# Altium PCB EMG_Arm_ELCT-V3.0.PcbDoc (part 2 of 3)
Units mil, origin at the board's own origin, x right, y up, seen from the top; angles counter-clockwise.
Board outline 8303.83 x 7532.25 mil, 2 copper layers (Top Layer, Bottom Layer), stack 3.556 mil thick; 104 components, 76 nets, 393 pads, 162 vias.
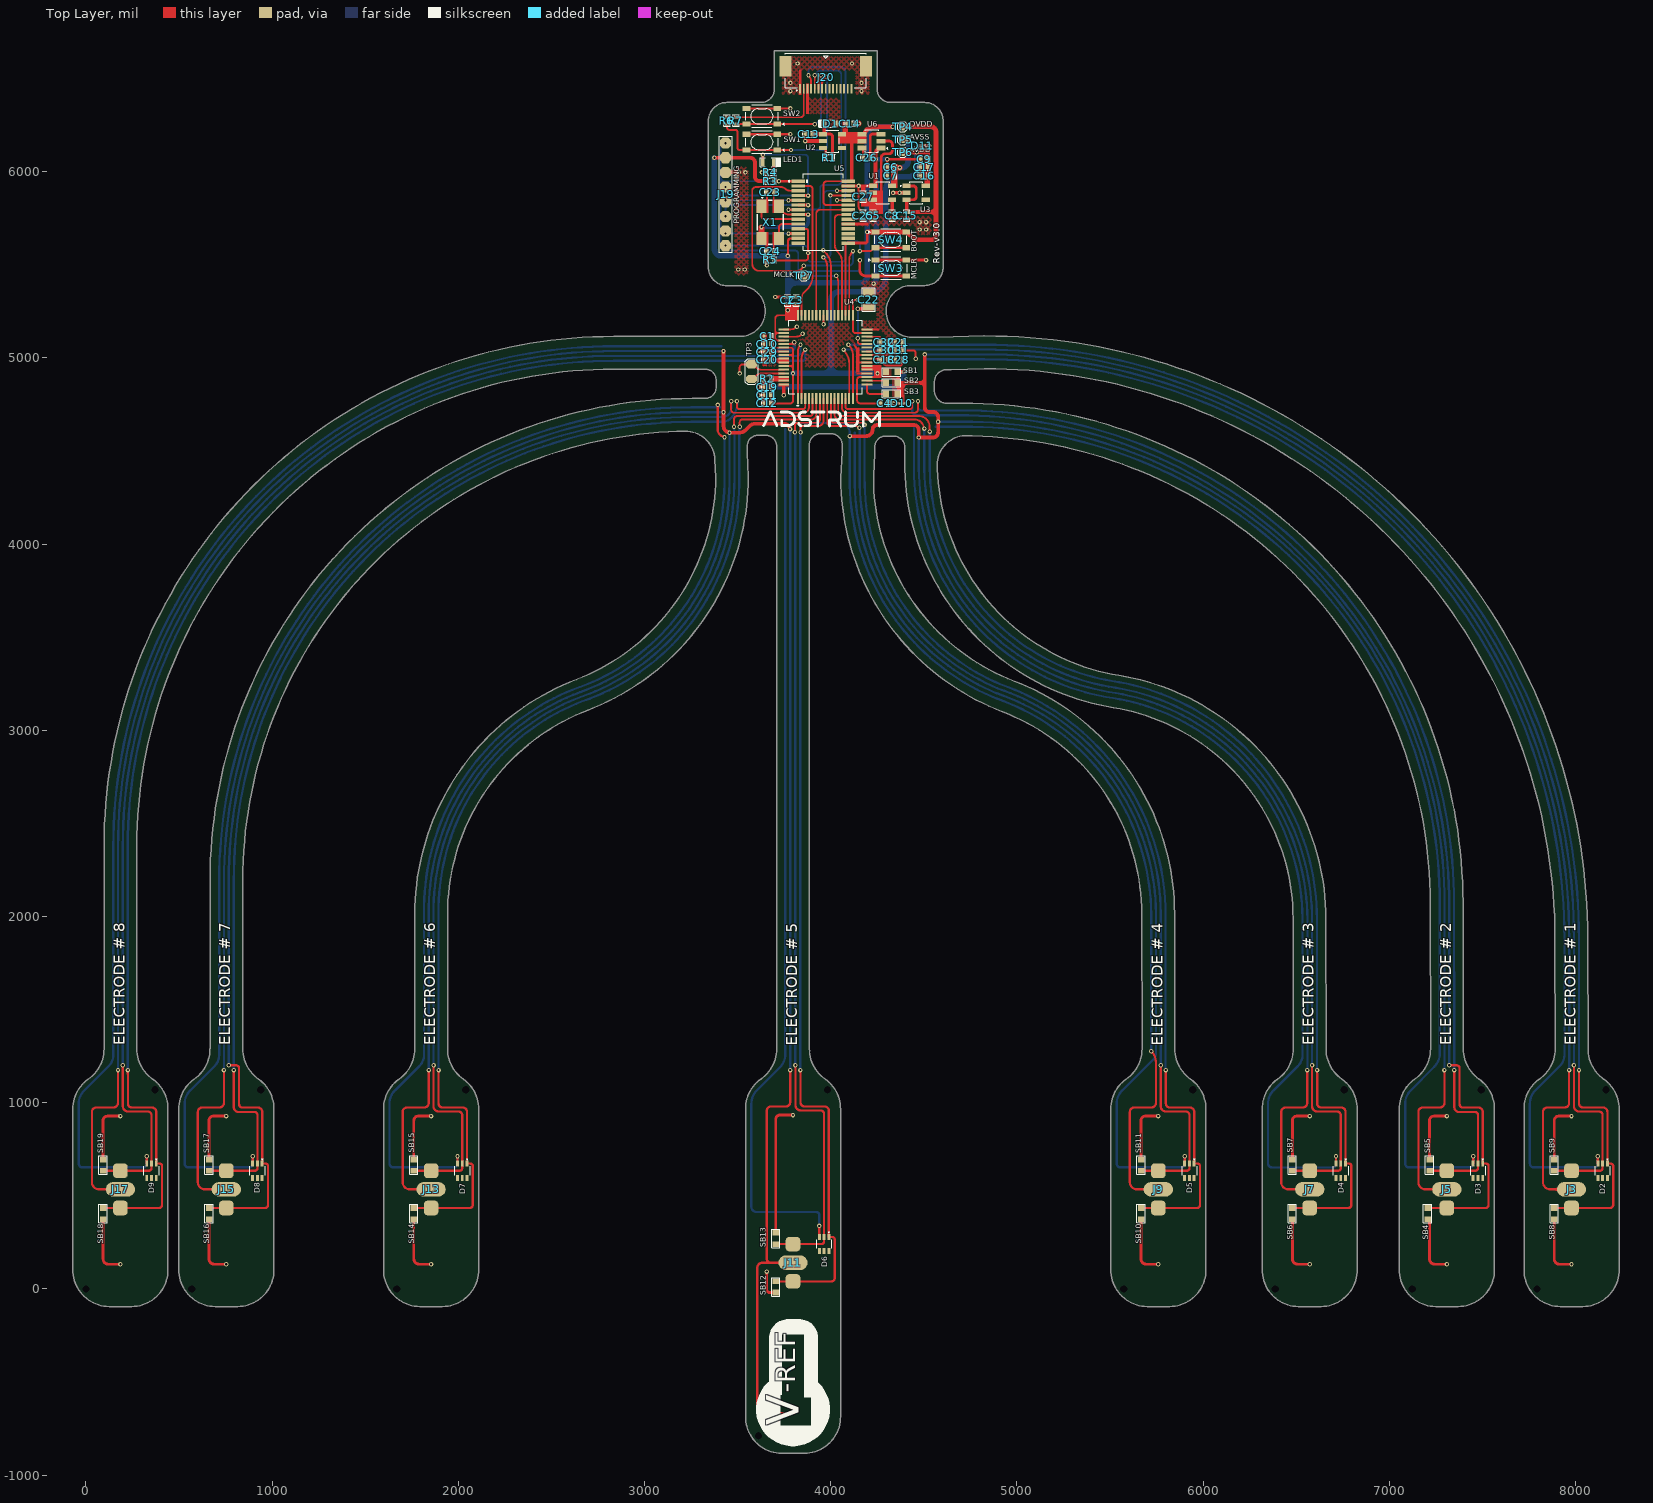
[diagram p0: Top Layer view]

## Part data (continued)
U1: "IC REG LIN -2.5V 200MA SOT23-5", Case/Package=SOT-23, Dropout Voltage=280mV, Input Bias Current=130uA, LCSC Part Number=C69932, Manufacturer="Texas Instruments", Max Operating Temperature=125°C, Max Output current=200mA, Max Output Voltage=-2.5V, Max Power Dissipation=560mW, Max Supply Voltage=-2.7V, Min Current Limit=300mA, Min Input Voltage=-10V, Min Operating Temperature=-40°C, Package Quantity=3000, Accuracy=2%, ComponentLink1Description=http://www.mouser.com/ds/2/405/slvs346c-521947.pdf?src-supplier=Mouser, ComponentLink1URL=http://www.mouser.com/ds/2/405/slvs346c-521947.pdf?src-supplier=Mouser, ComponentLink2Description=http://components.arrow.com/part/dataview/40177093S9611537N7713?src-supplier=Arrow+Electronics, ComponentLink2URL=http://components.arrow.com/part/dataview/40177093S9611537N7713?src-supplier=Arrow+Electronics, ComponentLink3Description=http://www.ti.com/general/docs/lit/getliterature.tsp?genericPartNumber=TPS723&amp;&amp;fileType=pdf&src-supplier=Farnell, ComponentLink3URL=http://www.ti.com/general/docs/lit/getliterature.tsp?genericPartNumber=TPS723&amp;&amp;fileType=pdf&src-supplier=Farnell, ComponentLink4Description=http://www.ti.com/general/docs/lit/getliterature.tsp?genericPartNumber=TPS723&amp;&amp;fileType=pdf&src-supplier=Element14, ComponentLink4URL=http://www.ti.com/general/docs/lit/getliterature.tsp?genericPartNumber=TPS723&amp;&amp;fileType=pdf&src-supplier=Element14, ComponentLink5Description=http://www.ti.com/lit/ds/symlink/tps723.pdf?src-supplier=Digikey, ComponentLink5URL=http://www.ti.com/lit/ds/symlink/tps723.pdf?src-supplier=Digikey, ComponentLink6Description=http://www.ti.com/general/docs/suppproductinfo.tsp?distId=10&amp;gotoUrl=http%3A%2F%2Fwww.ti.com%2Flit%2Fgpn%2Ftps723&src-supplier=Digikey, ComponentLink6URL=http://www.ti.com/general/docs/suppproductinfo.tsp?distId=10&amp;gotoUrl=http%3A%2F%2Fwww.ti.com%2Flit%2Fgpn%2Ftps723&src-supplier=Digikey, ComponentLink7Description=http://www.ti.com/general/docs/lit/getliterature.tsp?genericPartNumber=TPS723&amp;&amp;fileType=pdf&src-supplier=Newark, ComponentLink7URL=http://www.ti.com/general/docs/lit/getliterature.tsp?genericPartNumber=TPS723&amp;&amp;fileType=pdf&src-supplier=Newark, ComponentLink8Description=http://www.ti.com/general/docs/lit/getliterature.tsp?genericPartNumber=TPS723&&fileType=pdf&src-supplier=Avnet, ComponentLink8URL=http://www.ti.com/general/docs/lit/getliterature.tsp?genericPartNumber=TPS723&&fileType=pdf&src-supplier=Avnet, Item Type=IC, Lead Free="Lead Free", Manufacturer Part Number=TPS72325DBVR, Min Output Voltage=-2.5V, Nominal Output Voltage=-2.5V, Number of Outputs=1, Number of Regulators=1, Output Current=200mA, Output Type=Fixed, Output Voltage=-2.5V, Packaging="Tape and Reel", Pins=5, Polarity=Negative, Pricing="1=2.91, 10=1.99, 50=1.99, 100=1.79, 1000=1.59, 10000=1.49 (USD)", Quiescent Current=130uA, Radiation Hardening=No, Reach SVHC Compliant=No, RoHS=Yes, RoHS Compliant=Yes, Series=-, Stock=2906, Supplier=Mouser
U2: "IC REG LINEAR 3.3V 150MA SOT23-5", Case/Package=SOT-23-5, Dropout Voltage=300mV, LCSC Part Number=C295712, Manufacturer=Microchip, Max Operating Temperature=150°C, Max Output current=150mA, Max Supply Current=250uA, Max Supply Voltage=16V, Min Input Voltage=3.6V, Min Operating Temperature=-40°C, Min Output Voltage=3.3V, Power Supply Rejection Ratio (PSRR)=72dB, Quiescent Current=90uA, Accuracy=2%, ComponentLink1Description=https://datasheet.ciiva.com/26947/getdatasheetpartid-769851-26947956.pdf?src-supplier=Verical, ComponentLink1URL=https://datasheet.ciiva.com/26947/getdatasheetpartid-769851-26947956.pdf?src-supplier=Verical, ComponentLink2Description=https://datasheet.ciiva.com/13012/22276a-79238-13012583.pdf?src-supplier=Mouser, ComponentLink2URL=https://datasheet.ciiva.com/13012/22276a-79238-13012583.pdf?src-supplier=Mouser, ComponentLink3Description=https://datasheet.ciiva.com/8238/22276a-8238678.pdf?src-supplier=Avnet, ComponentLink3URL=https://datasheet.ciiva.com/8238/22276a-8238678.pdf?src-supplier=Avnet, ComponentLink4Description=https://datasheet.ciiva.com/2056/22276a-2056672.pdf?src-supplier=Digikey, ComponentLink4URL=https://datasheet.ciiva.com/2056/22276a-2056672.pdf?src-supplier=Digikey, Item Type=IC, Lead Free="Lead Free", Manufacturer Part Number=MCP1754T-3302E/OT, Number of Outputs=1, Number of Regulators=1, Output Configuration=Positive, Output Current=150mA, Output Type=Fixed, Output Voltage=3.3V, Packaging="Tape and Reel", Pins=5, Polarity=Positive, Pricing="1=0.5022, 10=0.4946, 25=0.487, 100=0.4793, 250=0.4717, 500=0.4641, 1000=0.4565, 3000=0.4488 (USD)", Radiation Hardening=No, RoHS=Yes, RoHS Compliant=Yes, Series=-, Stock=5987, Supplier="Arrow Electronics"
U3: "IC REG LINEAR 2.5V 200MA SOT23", LCSC Part Number=C2867307, Manufacturer="Texas Instruments", ComponentLink1Description=https://datasheet.ciiva.com/29568/tlv70025-q1-29568375.pdf?src-supplier=Digikey, ComponentLink1URL=https://datasheet.ciiva.com/29568/tlv70025-q1-29568375.pdf?src-supplier=Digikey, ComponentLink2Description=https://datasheet.ciiva.com/12958/slvsa61c-120807-12958385.pdf?src-supplier=Mouser, ComponentLink2URL=https://datasheet.ciiva.com/12958/slvsa61c-120807-12958385.pdf?src-supplier=Mouser, Item Type=IC, Manufacturer Part Number=TLV70025QDDCRQ1, Pricing="1=0.65, 10=0.41, 50=0.41, 100=0.334, 1000=0.306, 10000=0.269 (USD)", RoHS=Yes, Stock=2425, Supplier=Mouser
U4: "IC AFE 8 CHAN 24BIT 64TQFP", LCSC Part Number=C476817, Manufacturer="Texas Instruments", Power Consumption=41mW, ComponentLink1Description=https://datasheet.ciiva.com/13063/ads1299-224171-13063283.pdf?src-supplier=Mouser, ComponentLink1URL=https://datasheet.ciiva.com/13063/ads1299-224171-13063283.pdf?src-supplier=Mouser, ComponentLink2Description=https://datasheet.ciiva.com/26913/getdatasheetpartid-563195-26913237.pdf?src-supplier=Verical, ComponentLink2URL=https://datasheet.ciiva.com/26913/getdatasheetpartid-563195-26913237.pdf?src-supplier=Verical, ComponentLink3Description=https://datasheet.ciiva.com/6668/ads1299-6668469.pdf?src-supplier=Digikey, ComponentLink3URL=https://datasheet.ciiva.com/6668/ads1299-6668469.pdf?src-supplier=Digikey, Height=1.2mm, Item Type=IC, Lead Free=5697LeadFree, Length=10mm, Manufacturer Part Number=ADS1299IPAG, Pricing="1=77.46, 10=64.33, 50=60.74, 100=56.93, 1000=56.93, 10000=56.93 (USD)", RoHS=Yes, Stock=1661, Supplier=Mouser, Thickness=1mm, Width=10mm
U5: "IC MCU 32BIT 128KB FLASH 28SSOP", LCSC Part Number=C1337166, Manufacturer=Microchip, ComponentLink1Description=https://datasheet.ciiva.com/14666/0900766b811073be-14666654.pdf?src-supplier=Rs, ComponentLink1URL=https://datasheet.ciiva.com/14666/0900766b811073be-14666654.pdf?src-supplier=Rs, ComponentLink2Description=https://datasheet.ciiva.com/9231/61168d-9231544.pdf?src-supplier=Avnet, ComponentLink2URL=https://datasheet.ciiva.com/9231/61168d-9231544.pdf?src-supplier=Avnet, ComponentLink3Description=https://datasheet.ciiva.com/14131/pic32mx1xx-2xx-eng-tds-14131605.pdf?src-supplier=Distrelec, ComponentLink3URL=https://datasheet.ciiva.com/14131/pic32mx1xx-2xx-eng-tds-14131605.pdf?src-supplier=Distrelec, ComponentLink4Description=https://datasheet.ciiva.com/7665/1538023-7665726.pdf?src-supplier=Element14, ComponentLink4URL=https://datasheet.ciiva.com/7665/1538023-7665726.pdf?src-supplier=Element14, ComponentLink5Description=https://datasheet.ciiva.com/6650/61168e-6650631.pdf?src-supplier=Digikey, ComponentLink5URL=https://datasheet.ciiva.com/6650/61168e-6650631.pdf?src-supplier=Digikey, Item Type=IC, Manufacturer Part Number=PIC32MX250F128B-I/SS, Pricing="1=4.85, 25=4.43, 100=4.02 (USD)", RoHS=Yes, Stock=1227, Supplier=Digikey
U6: "IC REG CHRG PUMP INV 40MA SOT23", Case/Package=SOT-23, Frequency=160kHz, LCSC Part Number=C840095, Manufacturer="TI National Semiconductor", Max Operating Temperature=85°C, Max Output current=40mA, Max Output Voltage=-1.8V, Max Power Dissipation=600mW, Max Supply Voltage=5.5V, Min Input Voltage=1.8V, Min Operating Temperature=-40°C, Min Output Voltage=-5.5V, Output Power=500mW, Package Quantity=1000, Supply Current=500uA, Switching Frequency=80kHz, ComponentLink1Description=https://datasheet.ciiva.com/22669/1811104-22669560.pdf?src-supplier=Element14, ComponentLink1URL=https://datasheet.ciiva.com/22669/1811104-22669560.pdf?src-supplier=Element14, ComponentLink2Description=https://datasheet.ciiva.com/27055/1992911-27055843.pdf?src-supplier=Jameco, ComponentLink2URL=https://datasheet.ciiva.com/27055/1992911-27055843.pdf?src-supplier=Jameco, ComponentLink3Description=https://datasheet.ciiva.com/1641/1703149-1641090.pdf?src-supplier=Newark, ComponentLink3URL=https://datasheet.ciiva.com/1641/1703149-1641090.pdf?src-supplier=Newark, ComponentLink4Description=https://datasheet.ciiva.com/15114/getdatasheetpartid-117448-15114290.pdf?src-supplier=Verical, ComponentLink4URL=https://datasheet.ciiva.com/15114/getdatasheetpartid-117448-15114290.pdf?src-supplier=Verical, ComponentLink5Description=https://datasheet.ciiva.com/5699/1853535-5699178.pdf?src-supplier=Farnell, ComponentLink5URL=https://datasheet.ciiva.com/5699/1853535-5699178.pdf?src-supplier=Farnell, Height=1.02mm, Item Type=IC, Lead Free=5697LeadFree, Length=2.92mm, Logic Function=Inverting, Manufacturer Part Number=LM2664M6/NOPB, Min Supply Voltage=1.8V, Mounting Technology="Surface Mount", Number of Channels=1NUMBER, Number of Outputs=1, Output Current=40mA, Output Type=Fixed,Adjustable, Output Voltage=-5.5V, Packaging="Tape and Reel", Pins=6, Pricing="1=0.95, 10=0.616, 50=0.616, 100=0.507, 1000=0.467, 10000=0.422 (USD)", Radiation Hardening=No, Reach SVHC Compliant=No, RoHS=Yes, Series=-, Stock=36504, Supplier=Mouser, Synchronous Rectifier=No, Termination=SMD/SMT, Thickness=1.2mm, Topology="Buck-Boost,Charge Pump", Width=1.6mm
X1: library part ABMM2-8.000MHZ-E2-T, "CRYSTAL 8.0000MHZ 18PF SMD", LCSC Part Number=C431529, Manufacturer=Abracon, ComponentLink1Description=https://datasheet.ciiva.com/4945/abmm2-40161-4945441.pdf?src-supplier=Mouser, ComponentLink1URL=https://datasheet.ciiva.com/4945/abmm2-40161-4945441.pdf?src-supplier=Mouser, ComponentLink2Description=https://datasheet.ciiva.com/7998/1682206-7998656.pdf?src-supplier=Element14, ComponentLink2URL=https://datasheet.ciiva.com/7998/1682206-7998656.pdf?src-supplier=Element14, ComponentLink3Description=https://datasheet.ciiva.com/855/abmm2-855405.pdf?src-supplier=Digikey, ComponentLink3URL=https://datasheet.ciiva.com/855/abmm2-855405.pdf?src-supplier=Digikey, ComponentLink4Description=https://datasheet.ciiva.com/855/abmm2-855406.pdf?src-supplier=Digikey, ComponentLink4URL=https://datasheet.ciiva.com/855/abmm2-855406.pdf?src-supplier=Digikey, ComponentLink5Description=https://datasheet.ciiva.com/855/abmm2-855407.pdf?src-supplier=Digikey, ComponentLink5URL=https://datasheet.ciiva.com/855/abmm2-855407.pdf?src-supplier=Digikey, ComponentLink6Description=https://datasheet.ciiva.com/3176/abmm2-3176155.pdf?src-supplier=Avnet, ComponentLink6URL=https://datasheet.ciiva.com/3176/abmm2-3176155.pdf?src-supplier=Avnet, Item Type=Crystals, Lead Free=5697LeadFree, Manufacturer Part Number=ABMM2-8.000MHZ-E2-T, Pricing="1=0.84, 10=0.724, 50=0.724, 100=0.676, 1000=0.493, 10000=0.437 (USD)", RoHS=Yes, Stock=10241, Supplier=Mouser

## Free pads (board coordinates)
  round 0 hole 39.37 unplated: MH1(0,0) MH1(568.98,0) MH1(1668.76,0) MH1(3612.24,-788.41) MH1(5574.41,0) MH1(6387.12,-0.01) MH1(7123.87,0) MH1(7793.35,0) MH2(370.49,1069.27) MH2(939.47,1069.27) MH2(2039.25,1069.27) MH2(3982.73,1069.27) MH2(5944.9,1069.27) MH2(6757.61,1069.26) MH2(7494.36,1069.27) MH2(8163.83,1069.27)

## Via types
v1: diameter 23.62, hole 11.81, Top Layer to Bottom Layer, tented both sides, 162 vias

## Nets (pads, with @x,y where several pads share a name; then routed paths per layer and width w, separated by ;. In a path a pad name is that pad's centre, name@x,y a point inside that pad or via, vN(x,y) a via of type N, cw(c..) or ccw(c..) an arc to the next point about the centre after c; other vN are vias at no path point)
+VBATT_RAW: C13.1 D1.2 R1.1 U2.1 | length 288.6
  Top Layer w15: U2.1@3965.37,6204.32 3963.56,6202.51 U2.1@3958.7,6202.51 U2.1@3958.7,6202.51 3995.97,6202.45 cw(c3995.97,6188.54) 4009.88,6188.54 R1.1@4009.88,6076.61
  Top Layer w20: C13.1@3903.57,6202.51 U2.1@3958.7,6202.51 ; U2.1@3965.37,6204.32 D1.2@3965.37,6259.23
-RAW: C5.1 C27.2 U1.2 U1.3 U6.2 | length 445.4
  Top Layer w10: U1.3@4223.79,5850.46 cw(c4227.72,5850.46) U1.3@4227.72,5854.38
  Top Layer w15: U6.2@4270.54,6165.05 4312.59,6165.05 cw(c4312.59,6145.9) 4331.74,6145.9 4331.74,6116.25 cw(c4312.17,6116.25) 4312.17,6096.68 4292.71,6096.68 ccw(c4292.71,6074.92) 4270.95,6074.92 4270.95,5886.79
  Top Layer w20: C5.1@4228.79,5785.52 U1.3@4228.79,5850.46
_SRB1: SB3.2 U4.17 | length 146.7
  Top Layer w10: U4.17@4194.49,4858.22 4194.49,4822.08 ccw(c4209.38,4822.08) 4209.38,4807.19 SB3.2@4296.58,4807.19
_SRB2: SB2.2 U4.18 | length 108.7
  Top Layer w10: U4.18@4194.49,4877.9 4284.92,4877.9 cw(c4284.92,4866.24) SB2.2@4296.58,4866.24
AGND: C2.1 C3.1 C4.1 C5.2 C6.1 C7.2 C8.2 C9.1 C11.1 C12.1 C13.2 C14.2 C15.2 C16.2 C17.1 C21.1 C23.1 C24.1 C25.1 C27.1 C31.1 D2.3 D3.3 D4.3 D5.3 D6.3 D7.3 D8.3 D9.3 D10.2 D11.2 J19.3 J20.1 J20.MP1 J20.MP2 R4.1 R5.1 SW1.3 SW1.4 SW2.3 SW2.4 SW3.1 SW3.2 TP3.2 U1.1 U2.2 U3.2 U4.31 U4.33 U4.41 U4.49 U4.51 U4.60 U4.64 U5.8 U5.19 U5.27 U6.1 X1.2 X1.4 | length 51044.2
  Top Layer w10: v1(3510.81,4917.27) 3510.81,4948.93 cw(c3527.75,4948.93) 3527.75,4965.87 TP3.2@3574.22,4965.87 ; 3598.88,4948.93 ccw(c3627.81,4977.89) 3627.81,4936.96 U4.60@3748.03,4936.96 ; X1.2@3628.14,5641.32 cw(c3628.14,5612.58) 3656.88,5612.58 ; C24.1@3655.7,5571.87 cw(c3656.88,5571.87) C24.1@3656.88,5573.05 ; C23.1@3693.88,5889.35 3693.88,5843.28 ccw(c3722.62,5843.28) X1.4@3722.62,5814.54 3742.83,5784.11 ccw(c3775.01,5814.54) 3775.01,5770.25 U5.8@3826.52,5770.25 ; U4.51@3748.03,5114.12 3810.32,5114.12 ccw(c3810.32,5168.57) v1(3848.82,5130.07) ; U4.49@3748.03,5153.49 3784.11,5153.49 ccw(c3784.11,5200.44) 3817.31,5167.24 v1(3818.11,5168.05) ; v1(3961.42,5181.45) U4.41@3961.42,5229.08 ; v1(4145.43,5312.36) 4133.33,5312.36 ccw(c4133.33,5297.93) 4118.9,5297.93 U4.33@4118.9,5229.08 4118.9,5148.24 ccw(c4133.33,5148.24) 4133.33,5133.81 U4.31@4194.49,5133.81 ; v1(4149.38,5924.05) 4149.38,5923.8 4149.38,5815.15 ccw(c4175.38,5815.15) 4157.67,5796.12 4167.88,5786.61 C25.1@4175.38,5782.61 ; C31.1@4382.71,5040.89 4441.96,5040.89 cw(c4441.96,5026.77) 4456.08,5026.77 v1@4456.08,4995.82 ; C31.1@4382.71,5041.89 C21.1@4382.71,5083.41 C21.1@4382.71,5084.41
  Top Layer w12: D9.3@326.44,673.19 v1(326.45,713.05) ; D8.3@895.42,673.19 v1(895.42,713.05) ; D7.3@1995.21,673.19 v1(1995.21,713.05) ; v1(3393.32,4748.05) 3393.32,4614.18 ccw(c3429.14,4614.18) 3412.49,4582.46 v1(3429.14,4573.72) ; SW1.4@3547.7,6201.59 SW1.3@3713.06,6201.59 3782.6,6201.59 ccw(c3782.6,6202.51) v1(3783.52,6202.51) ; SW2.4@3547.7,6340.37 SW2.3@3713.06,6340.37 v1(3783.52,6340.37) ; D6.3@3938.69,278.99 D6.3@3938.69,279.99 v1(3938.69,338.65) ; D5.3@5900.85,673.19 v1(5900.85,713.05) ; D4.3@6713.57,673.18 v1(6713.57,713.04) ; D3.3@7450.31,673.19 v1(7450.32,713.05) ; D2.3@8119.79,673.19 v1(8119.79,713.05)
  Top Layer w15: v1(3612.38,4800.05) 3612.38,4799.56 C11.1@3641.7,4799.56 C12.1@3641.7,4755.56 ; C24.1@3655.7,5571.87 3656.88,5570.69 3656.88,5526.91 v1(3656.88,5497.05) ; C24.1@3656.88,5573.05 3656.88,5612.58 ; v1(3702.26,5327.55) C2.1@3769.38,5327.55 C3.1@3813.61,5327.55 ; U5.8@3826.52,5770.25 v1@3878.57,5770.25 ; v1@3862.62,6165.25 C13.2@3862.62,6200.01 ; U5.27@4094.24,5923.8 4149.38,5923.8 U1.1@4222.33,5923.8 ; SW3.1@4240.5,5525.37 SW3.2@4405.86,5525.37 v1(4512.27,5525.37) ; C7.2@4303.74,5978.37 C6.1@4303.74,6024.61 v1(4303.74,6067.05) C9.1@4483.73,6067.05 C17.1@4483.73,6024.61 C16.2@4483.73,5978.35
  Top Layer w20: J19.3@3435.49,5996.68 v1(3505.38,5996.68) ; v1@3631,5996.68 R4.1@3652.97,5996.68 ; v1(3748.03,4799.56) U4.64@3748.03,4853.73 ; v1@3862.62,6165.25 v1(3863,6164.87) 3863.12,6164.99 3958.58,6164.99 U2.2@3958.7,6165.11 ; C14.2@4123.65,6259.23 v1(4149.38,6259.23) ; U1.1@4227.72,5924.19 4237.57,5924.19 U1.1@4239.38,5926 ; U1.1@4240.86,5928.53 v1(4240.86,6066.61) 4240.86,6097.97 cw(c4270.54,6097.97) 4259.32,6125.45 cw(c4270.54,6097.97) U6.1@4270.54,6127.65 ; C4.1@4309.44,4755.86 v1(4339.17,4755.86) ; v1(4334.74,5886.42) 4334.74,5886.79 v1(4369.88,5886.79) U3.2@4407.71,5886.79
  Top Layer w25: J19.3@3435.38,5996.79 J19.3@3435.49,5996.68
  Top Layer w30: X1.2@3628.14,5641.32 v1(3628.14,5702.86)
  Bottom Layer w12: v1(326.45,713.05) 326.45,670.92 cw(c308.57,670.92) 308.57,653.05 -18.38,653.05 cw(c-18.38,673.42) -38.75,673.42 -38.75,995.3 cw(c61.25,995.3) -9.46,1066.01 122.53,1198 ccw(c63.41,1257.12) 147.02,1257.12 147.02,2378.83 cw(c2832.63,2377.32) 2834.14,5062.94 3411.4,5062.94 ; v1(895.42,713.05) 895.42,670.92 cw(c877.55,670.92) 877.55,653.05 550.6,653.05 cw(c550.6,673.42) 530.23,673.42 530.23,995.3 cw(c630.23,995.3) 559.52,1066.01 691.51,1198 ccw(c633.03,1256.48) 715.73,1256.48 715.73,2193.94 cw(c3252.93,2197.73) 3249.14,4734.94 3404.99,4734.94 ; v1(1995.21,713.05) 1995.21,670.92 cw(c1977.33,670.92) 1977.33,653.05 1650.38,653.05 cw(c1650.38,673.42) 1630.01,673.42 1630.01,995.3 cw(c1730.01,995.3) 1659.3,1066.01 1791.29,1198 ccw(c1732.29,1257) 1815.73,1257 1815.73,2018 cw(c3093.37,2034.23) 2688.77,3246.23 ccw(c2240.22,4347.96) 3429.7,4360.09 3429.16,4566.72 v1(3429.14,4573.72) v1@3429.14,4575.72 ; 3755.75,4618.16 3755.75,1375.13 3755.75,1260.4 cw(c3655.75,1260.4) 3726.46,1189.69 3602.78,1066.01 ccw(c3673.5,995.3) 3573.5,995.3 3573.5,440.87 ccw(c3601.32,440.87) 3601.32,413.05 3922.28,413.05 cw(c3922.28,396.64) 3938.69,396.64 v1(3938.69,338.65) ; 4128.73,4598.71 4128.73,4354.88 ccw(c5369.33,4344.18) 4891.89,3199.08 cw(c4482.97,2003.1) 5746.84,2017.92 5746.84,1264.93 cw(c5704.86,1264.93) 5734.55,1235.25 5666.3,1167 5665.94,1167 5564.95,1066.01 ccw(c5635.66,995.3) 5535.66,995.3 5535.66,673.42 ccw(c5556.03,673.42) 5556.03,653.05 5882.98,653.05 ccw(c5882.98,670.92) 5900.85,670.92 v1(5900.85,713.05) ; 4446.74,4623.38 4446.74,4440.52 ccw(c5703.88,4416.19) 5478.29,3179.22 cw(c5324.41,1979.64) 6533.75,1992.9 6533.75,1355.04 6533.75,1256.18 cw(c6451.47,1256.18) 6509.65,1197.99 6377.66,1066.01 ccw(c6448.37,995.3) 6348.37,995.3 6348.37,673.41 ccw(c6368.74,673.41) 6368.74,653.04 6695.69,653.04 ccw(c6695.69,670.92) 6713.57,670.92 v1(6713.57,713.04) ; 4509.43,4992.94 4825.14,4992.94 cw(c4827.69,1880.38) 7940.25,1882.94 7940.25,1256.92 7940.25,1256.85 cw(c7857.03,1256.85) 7940.25,1256.6 cw(c7857.03,1256.85) 7915.87,1198 7783.89,1066.01 ccw(c7854.6,995.3) 7754.6,995.3 7754.6,673.42 ccw(c7774.96,673.42) 7774.96,653.05 8101.92,653.05 ccw(c8101.92,670.92) 8119.79,670.92 v1(8119.79,713.05) ; 4564.47,4631.22 4706.85,4631.22 cw(c4709.66,2070.13) 7270.75,2072.94 7270.75,1263.77 cw(c7170.75,1263.77) 7241.46,1193.06 7114.41,1066.01 ccw(c7185.12,995.3) 7085.12,995.3 7085.12,673.42 ccw(c7105.49,673.42) 7105.49,653.05 7432.44,653.05 ccw(c7432.44,670.92) 7450.32,670.92 v1(7450.32,713.05)
  Bottom Layer w20: v1(3628.14,5702.86) 3850.5,5702.86 ccw(c3850.5,5730.93) 3878.57,5730.93 v1(3878.57,5770.01) ; v1@4303.74,6066.61 v1(4303.74,6067.05)
  Bottom Layer w25: v1(4240.86,6066.61) v1@4303.74,6066.61
  other v1: 4456.38,4995.52 3503.16,5475.09 3538.29,5475.09 4477.13,5689.9 4512.27,5689.9 4477.13,5729.49 4512.27,5729.49 3541.62,5996.68 3630.02,5996.68 4528.3,6140.29 3783.52,6433.05 4165.38,6433.05 3783.52,6477.24 4165.38,6477.24 3821.98,6581.54 4113.89,6581.54
AVDD: C1.2 C4.2 C9.2 C10.2 C11.2 C12.2 C16.1 C17.2 D11.1 TP6.1 U3.5 U4.19 U4.21 U4.22 U4.54 U4.56 U4.59 | length 3378.4
  Top Layer w10: C12.2@3678.7,4755.56 3781.45,4755.56 ccw(c3781.45,4771.45) 3797.33,4771.45 v1(3797.33,4917.25) 3797.33,4942.95 ; C1.2@3678.71,5116.29 C10.2@3678.71,5072.79 3682.71,5065.29 3684.69,5062.51 ccw(c3699.13,5072.79) 3699.13,5055.07 U4.54@3748.03,5055.07 3786.21,5055.07 cw(c3786.21,5043.95) 3797.33,5043.95 3797.33,5002 ; U4.59@3748.03,4956.64 3783.64,4956.64 ; U4.56@3748.03,5015.7 3783.64,5015.7 ; 3797.33,4970.34 cw(c3783.64,4970.34) 3783.64,4956.64 ; 3797.33,5029.39 cw(c3783.64,5029.39) 3783.64,5015.7 ; U4.19@4194.49,4897.59 4155.56,4897.59 ccw(c4155.56,4883.41) 4141.38,4883.41 4141.38,4773.03 ccw(c4158.55,4773.03) 4158.55,4755.86 C4.2@4269.08,4755.86 ; v1(4461.61,6104.88) v1@4461.83,6105.1 ; 4483.83,6105.1 D11.1@4483.83,6140.33 ; 3783.64,4956.64 cw(c3783.64,4942.95) 3797.33,4942.95 ; 3783.64,5015.7 cw(c3783.64,5002) 3797.33,5002 ; 3797.33,4942.95 3797.33,5002
  Top Layer w15: C12.2@3678.7,4755.56 C11.2@3678.7,4799.56 ; 4506.09,6104.88 cw(c4506.09,6090.25) 4520.73,6090.25 C9.2@4520.73,6067.05
  Top Layer w25: TP6.1@4385.38,6104.88 v1(4461.61,6104.88) 4506.09,6104.88
  Bottom Layer w30: v1(3797.33,4917.25) 3961.09,4917.25 ; v1(4250.97,4917.25) 4041.39,4917.25 ; v1(4461.61,6104.88) 4461.61,6014.51 cw(c4420.15,6014.51) 4420.15,5973.05 4365.6,5973.05 ccw(c4365.6,5902.84) 4295.38,5902.84 4295.38,5431.2 cw(c4219.08,5431.2) 4219.08,5354.89 4044,5354.89 ccw(c4044,5312.13) 4001.24,5312.13 4001.24,4957.4 ; 3961.09,4917.25 ccw(c3961.09,4957.4) 4001.24,4957.4 ; 3961.09,4917.25 4041.39,4917.25 ; 4001.24,4957.4 ccw(c4041.39,4957.4) 4041.39,4917.25
AVSS: C1.1 C6.2 C7.1 C10.1 C18.2 C20.1 C21.2 C22.1 C28.1 C29.1 C30.1 C31.2 C32.1 TP5.1 U1.5 U4.20 U4.23 U4.25 U4.32 U4.53 U4.57 U4.58 | length 1339.1
  Top Layer w12: C20.1@3641.71,4984.5 C20.1@3641.71,4989.5 3641.71,5029.38 C29.1@3641.71,5031.38 C1.1@3641.71,5116.29
  Top Layer w20: v1(3613.05,5039.75) 3631.34,5039.75
  Top Layer w30: C6.2@4340.74,6024.61 4342.74,6022.61 v1(4370.62,6022.61) ; TP5.1@4385.38,6173.05 v1(4415.38,6173.05)
  Bottom Layer w20: v1(3613.05,5039.75) 3781.53,5039.75 ccw(c3781.53,5062.25) 3804.03,5062.25 v1(3804.03,5084.75)
  Bottom Layer w30: v1(4230.38,5399.5) ccw(c4193.97,5435.91) 4245.46,5435.91 4245.46,5949.28 cw(c4318.8,5949.28) 4318.8,6022.61 v1(4370.62,6022.61) 4382.74,6022.61 ccw(c4382.74,6055.25) 4415.38,6055.25 v1(4415.38,6173.05)
BIAS_DRV: C19.1 R2.1 SB1.2 | length 960.5
  Top Layer w15: v1@3612.39,4843.9 C19.1@3641.7,4843.9 R2.1@3641.71,4888.78
  Top Layer w20: SB1.2@4356.58,4924.78 v1(4392.85,4924.78)
  Bottom Layer w30: v1(3612.39,4844.39) 4367.58,4844.39 ccw(c4367.58,4869.66) 4392.85,4869.66 v1(4392.85,4924.78)
BIAS_DRV_ELCT: D10.1 J3.2 J5.2 J7.2 J9.2 J11.2 J12.3 J13.2 J15.2 J17.2 SB1.1 SB2.1 SB3.1 | length 49532.9
  Top Layer w10: 4389.97,4863.59 4392.62,4866.24 ; D10.1@4390.97,4757.24 4390.97,4856.78 4390.97,4863.59
  Top Layer w12: v1(172.04,1175.36) 172.04,999.49 cw(c146.82,999.49) 146.82,974.27 55.34,974.27 ccw(c55.34,950.96) 32.04,950.9 32.04,573.05 ccw(c70.09,573.05) 70.09,535 J17.2@185,535 ; v1(741.01,1175.36) 741.01,999.49 cw(c715.79,999.49) 715.79,974.27 624.32,974.27 ccw(c624.32,950.97) 601.01,950.9 601.01,573.05 ccw(c639.07,573.05) 639.07,535 J15.2@753.98,535 ; v1(1840.8,1175.36) 1840.8,999.49 cw(c1815.58,999.49) 1815.58,974.27 1724.1,974.27 ccw(c1724.1,950.96) 1700.8,950.9 1700.8,573.05 ccw(c1738.85,573.05) 1738.85,535 J13.2@1853.76,535 ; 3656.36,162.74 ccw(c3678.37,162.81) 3678.31,140.8 ; 3656.36,162.81 3656.36,957.55 cw(c3678.91,957.52) 3678.91,980.07 3759.06,980.07 ccw(c3759.06,1003.05) 3782.03,1003.05 v1(3782.03,1175.37) ; v1(3785.38,-666.95) 3625.38,-666.95 cw(c3625.38,-646.95) 3605.38,-646.95 3605.38,113.05 cw(c3633.13,113.05) 3633.13,140.8 3678.31,140.8 ; J11.2@3797.24,140.8 3678.31,140.8 ; v1(5721.25,1277.05) cw(c5660.43,1216.23) 5746.45,1216.23 5746.45,999.49 cw(c5721.23,999.49) 5721.23,974.27 5629.75,974.27 ccw(c5629.75,950.97) 5606.45,950.9 5606.45,573.05 ccw(c5644.5,573.05) 5644.5,535 J9.2@5759.41,535 ; v1(6559.16,1175.36) 6559.16,999.49 cw(c6533.94,999.49) 6533.94,974.27 6442.47,974.27 ccw(c6442.47,950.96) 6419.16,950.89 6419.16,573.04 ccw(c6457.21,573.04) 6457.21,534.99 J7.2@6572.12,534.99 ; v1(7295.91,1175.36) 7295.91,999.49 cw(c7270.69,999.49) 7270.69,974.27 7179.21,974.27 ccw(c7179.21,950.97) 7155.91,950.9 7155.91,573.05 ccw(c7193.96,573.05) 7193.96,535 J5.2@7308.87,535 ; v1(7965.38,1175.36) 7965.38,999.49 cw(c7940.16,999.49) 7940.16,974.27 7848.69,974.27 ccw(c7848.69,950.96) 7825.38,950.9 7825.38,573.05 ccw(c7863.43,573.05) 7863.43,535 J3.2@7978.35,535
  Top Layer w20: v1(3424.01,4708.94) v1(3424.01,5036.94) ; v1@3424.33,4708.61 3424.33,4639.93 3424.33,4632.86 ccw(c3456.43,4632.86) 3445.32,4602.74 v1(3456.37,4598.67) ; v1@3459.5,4598.53 3494.03,4598.53 3506.44,4598.53 ccw(c3506.44,4651.94) 3544.18,4614.15 ; 3544.21,4614.18 3565.06,4635.03 cw(c3593.18,4606.85) 3593.18,4646.66 3747.91,4646.66 cw(c3747.91,4610.27) 3772.18,4637.39 3775.03,4634.53 cw(c3747.91,4610.27) 3775.87,4633.56 v1(3781.45,4618.16) ; v1(4102.43,4580.31) 4189.4,4580.31 ccw(c4189.4,4615.83) 4224.91,4615.83 cw(c4248.76,4615.83) 4248.76,4639.67 4446.82,4639.67 cw(c4446.82,4613.57) 4472.92,4613.57 v1(4472.92,4572.97) 4548.57,4572.97 ccw(c4548.57,4601.16) 4576.76,4601.16 v1(4576.76,4657.94) 4576.76,4683.83 ccw(c4550.65,4683.83) 4550.65,4709.94 4528.68,4709.94 cw(c4528.68,4733.23) 4505.38,4733.23 4505.38,4841.74 ; SB2.1@4356.58,4866.24 4381.31,4866.24 ; 4360.7,4845.64 cw(c4381.31,4845.64) 4381.31,4866.24 ; 4360.7,4886.85 ccw(c4381.31,4886.85) 4381.31,4866.24 ; 4387.6,4845.49 cw(c4408.21,4845.49) 4390.97,4856.78 cw(c4408.21,4845.49) 4408.21,4866.09 ; 4500.88,4866.24 4480.88,4866.24 ; v1(4505.38,5018.94) 4505.38,4890.74 ; 4381.31,4866.24 4392.62,4866.24 4480.88,4866.24 ; 4480.88,4866.24 ccw(c4480.88,4890.74) 4505.38,4890.74 ; 4480.88,4866.24 cw(c4480.88,4841.74) 4505.38,4841.74 ; 4505.38,4841.74 4505.38,4890.74
  Bottom Layer w12: v1(172.04,1175.36) 172.34,1175.67 172.34,2378.94 cw(c2832.24,2377.04) 2834.14,5036.94 v1(3424.01,5036.94) ; v1(741.01,1175.36) 741.32,1175.67 741.32,2193.94 cw(c3252.73,2197.53) 3249.14,4708.94 v1(3424.01,4708.94) ; v1@1841.26,1176.47 cw(c1839.69,1176.47) v1(1840.8,1175.36) ccw(c1839.54,1176.62) 1841.32,1176.62 1841.32,2014.96 cw(c3096.2,2031.03) 2688.55,3217.96 ccw(c2245.92,4344.71) 3456.37,4361.53 v1(3456.37,4598.67) v1@3456.37,4606.67 ; v1(3781.45,4618.16) cw(c3814.7,4618.16) 3814.7,4651.41 4046.15,4651.41 cw(c4046.15,4594.19) 4086.61,4634.65 cw(c4048.42,4596.46) 4102.43,4596.46 v1(4102.43,4580.31) 4102.43,4354.12 ccw(c5365.08,4341.46) 4894.64,3169.65 cw(c4479.71,1999.39) 5721.25,2014.95 v1(5721.25,1277.05) ; v1@3782.04,1177.19 v1@3782.03,4618.16 ; v1@4472.97,4572.97 4472.97,4443.55 ccw(c5704.31,4419.63) 5492.43,3206.42 cw(c5322.15,1980.41) 6559.91,1984.52 6559.91,1177.18 cw(c6557.34,1177.18) v1(6559.16,1175.36) ; v1(4505.38,5018.94) 4825.14,5018.94 cw(c4827.49,1880.58) 7965.84,1882.94 7965.84,1176.47 cw(c7964.27,1176.47) v1(7965.38,1175.36) ; v1(4576.76,4657.94) 4706.15,4657.94 cw(c4708.74,2070.33) 7296.34,2072.94 7296.34,1176.41 cw(c7294.86,1176.41) v1(7295.91,1175.36) ccw(c7294.8,1176.47) v1@7296.37,1176.47
BIAS_INV: TP3.1 U4.61 | length 169.7
  Top Layer w10: TP3.1@3586.87,4892.08 3599.47,4904.67 ; 3599.5,4904.7 cw(c3629.89,4874.26) 3629.89,4917.27 U4.61@3748.03,4917.27
Boot_EN: J19.8 R5.2 SW4.3 SW4.4 U5.11 | length 1580.5
  Top Layer w10: R5.2@3693.88,5524.09 3864.64,5524.09 ccw(c3864.64,5538.02) 3878.57,5538.02 v1(3878.57,5563.5) 3878.57,5683.08 ccw(c3868.16,5683.08) 3868.16,5693.48 U5.11@3826.52,5693.48 ; v1(4156.35,5573.69) 4208.28,5573.69 ccw(c4208.28,5591.7) 4222.05,5580.09 4224.44,5582.92 SW4.3@4240.11,5591.7
  Top Layer w15: SW4.3@4240.11,5591.7 SW4.4@4405.47,5591.7
  Bottom Layer w10: v1(3435.38,5603.29) 3858.41,5603.29 cw(c3858.41,5583.13) 3878.57,5583.13 3878.57,5531.88 ccw(c3893.96,5531.88) 3893.96,5516.49 4059.21,5516.49 ccw(c4059.21,5536.65) 4079.37,5536.65 4079.37,5609.18 cw(c4095.24,5609.18) 4095.24,5625.05 4140.47,5625.05 cw(c4140.47,5609.17) 4156.35,5609.17 v1(4156.35,5573.69)
CLK: TP7.1 U4.37 | length 389.3
  Top Layer w10: v1@4027.2,5441.2 v1(4029.42,5441.05) 4034.9,5430.84 cw(c3995.93,5409.92) 4040.16,5409.95 4040.16,5409.86 U4.37@4040.16,5229.08
  Bottom Layer w10: v1@3857.74,5441.05 v1@4030.59,5441.05
  other v1: 3855.38,5441.05
CSI: U4.39 U5.26 | length 804.3
  Top Layer w10: v1(3960.38,5578.05) ccw(c3963.53,5578.05) 3961.3,5575.83 3970.74,5566.39 cw(c3898.19,5493.84) 4000.79,5493.84 ; U4.39@4000.79,5229.08 4000.79,5493.8 ; v1(4033.38,5898.05) 4033.54,5898.21 U5.26@4094.24,5898.21
  Bottom Layer w10: v1(3960.38,5578.05) 3960.38,5873.05 cw(c3985.38,5873.05) 3985.38,5898.05 v1(4033.38,5898.05)
D13: J19.6 U5.6 | length 545.8
  Top Layer w15: U5.6@3826.52,5821.44 v1@3878.57,5821.44
  Bottom Layer w10: v1(3435.38,5760.77) 3435.38,5798.28 cw(c3458.29,5798.28) 3458.29,5821.19 v1(3878.57,5821.19)
D18: J19.7 U5.12 | length 389.9
  Top Layer w15: v1@3773.38,5667.89 U5.12@3826.52,5667.89
  Bottom Layer w10: v1@3436.58,5668.1 v1(3773.38,5668.1)
  other v1: 3435.38,5668.1
DRDY: U4.47 U5.2 | length 782.1
  Top Layer w10: U5.2@3826.52,5923.8 3826.52,5924.05 3886.07,5924.05 cw(c3886.07,5907.74) 3902.38,5907.74 3902.38,5439.63 cw(c3802.38,5439.63) 3884.14,5382.05 cw(c3802.38,5439.63) 3873.09,5368.92 3857.87,5353.7 ccw(c3893.02,5318.55) 3843.31,5318.55 U4.47@3843.31,5229.08